# Altium PCB OpenRex_V1I1_PCB.PcbDoc (part 3 of 12)
Units mm, origin at the board's own origin, x right, y up, seen from the top; angles counter-clockwise.
Board outline 70 x 95 mm, 10 copper layers (L1, L2, L3, L4 (PWR), L5 (PWR), L6 (PWR), L7 (PWR), L8, L9, L10), stack 1.632 mm thick; 1080 components, 708 nets, 3831 pads, 2373 vias.
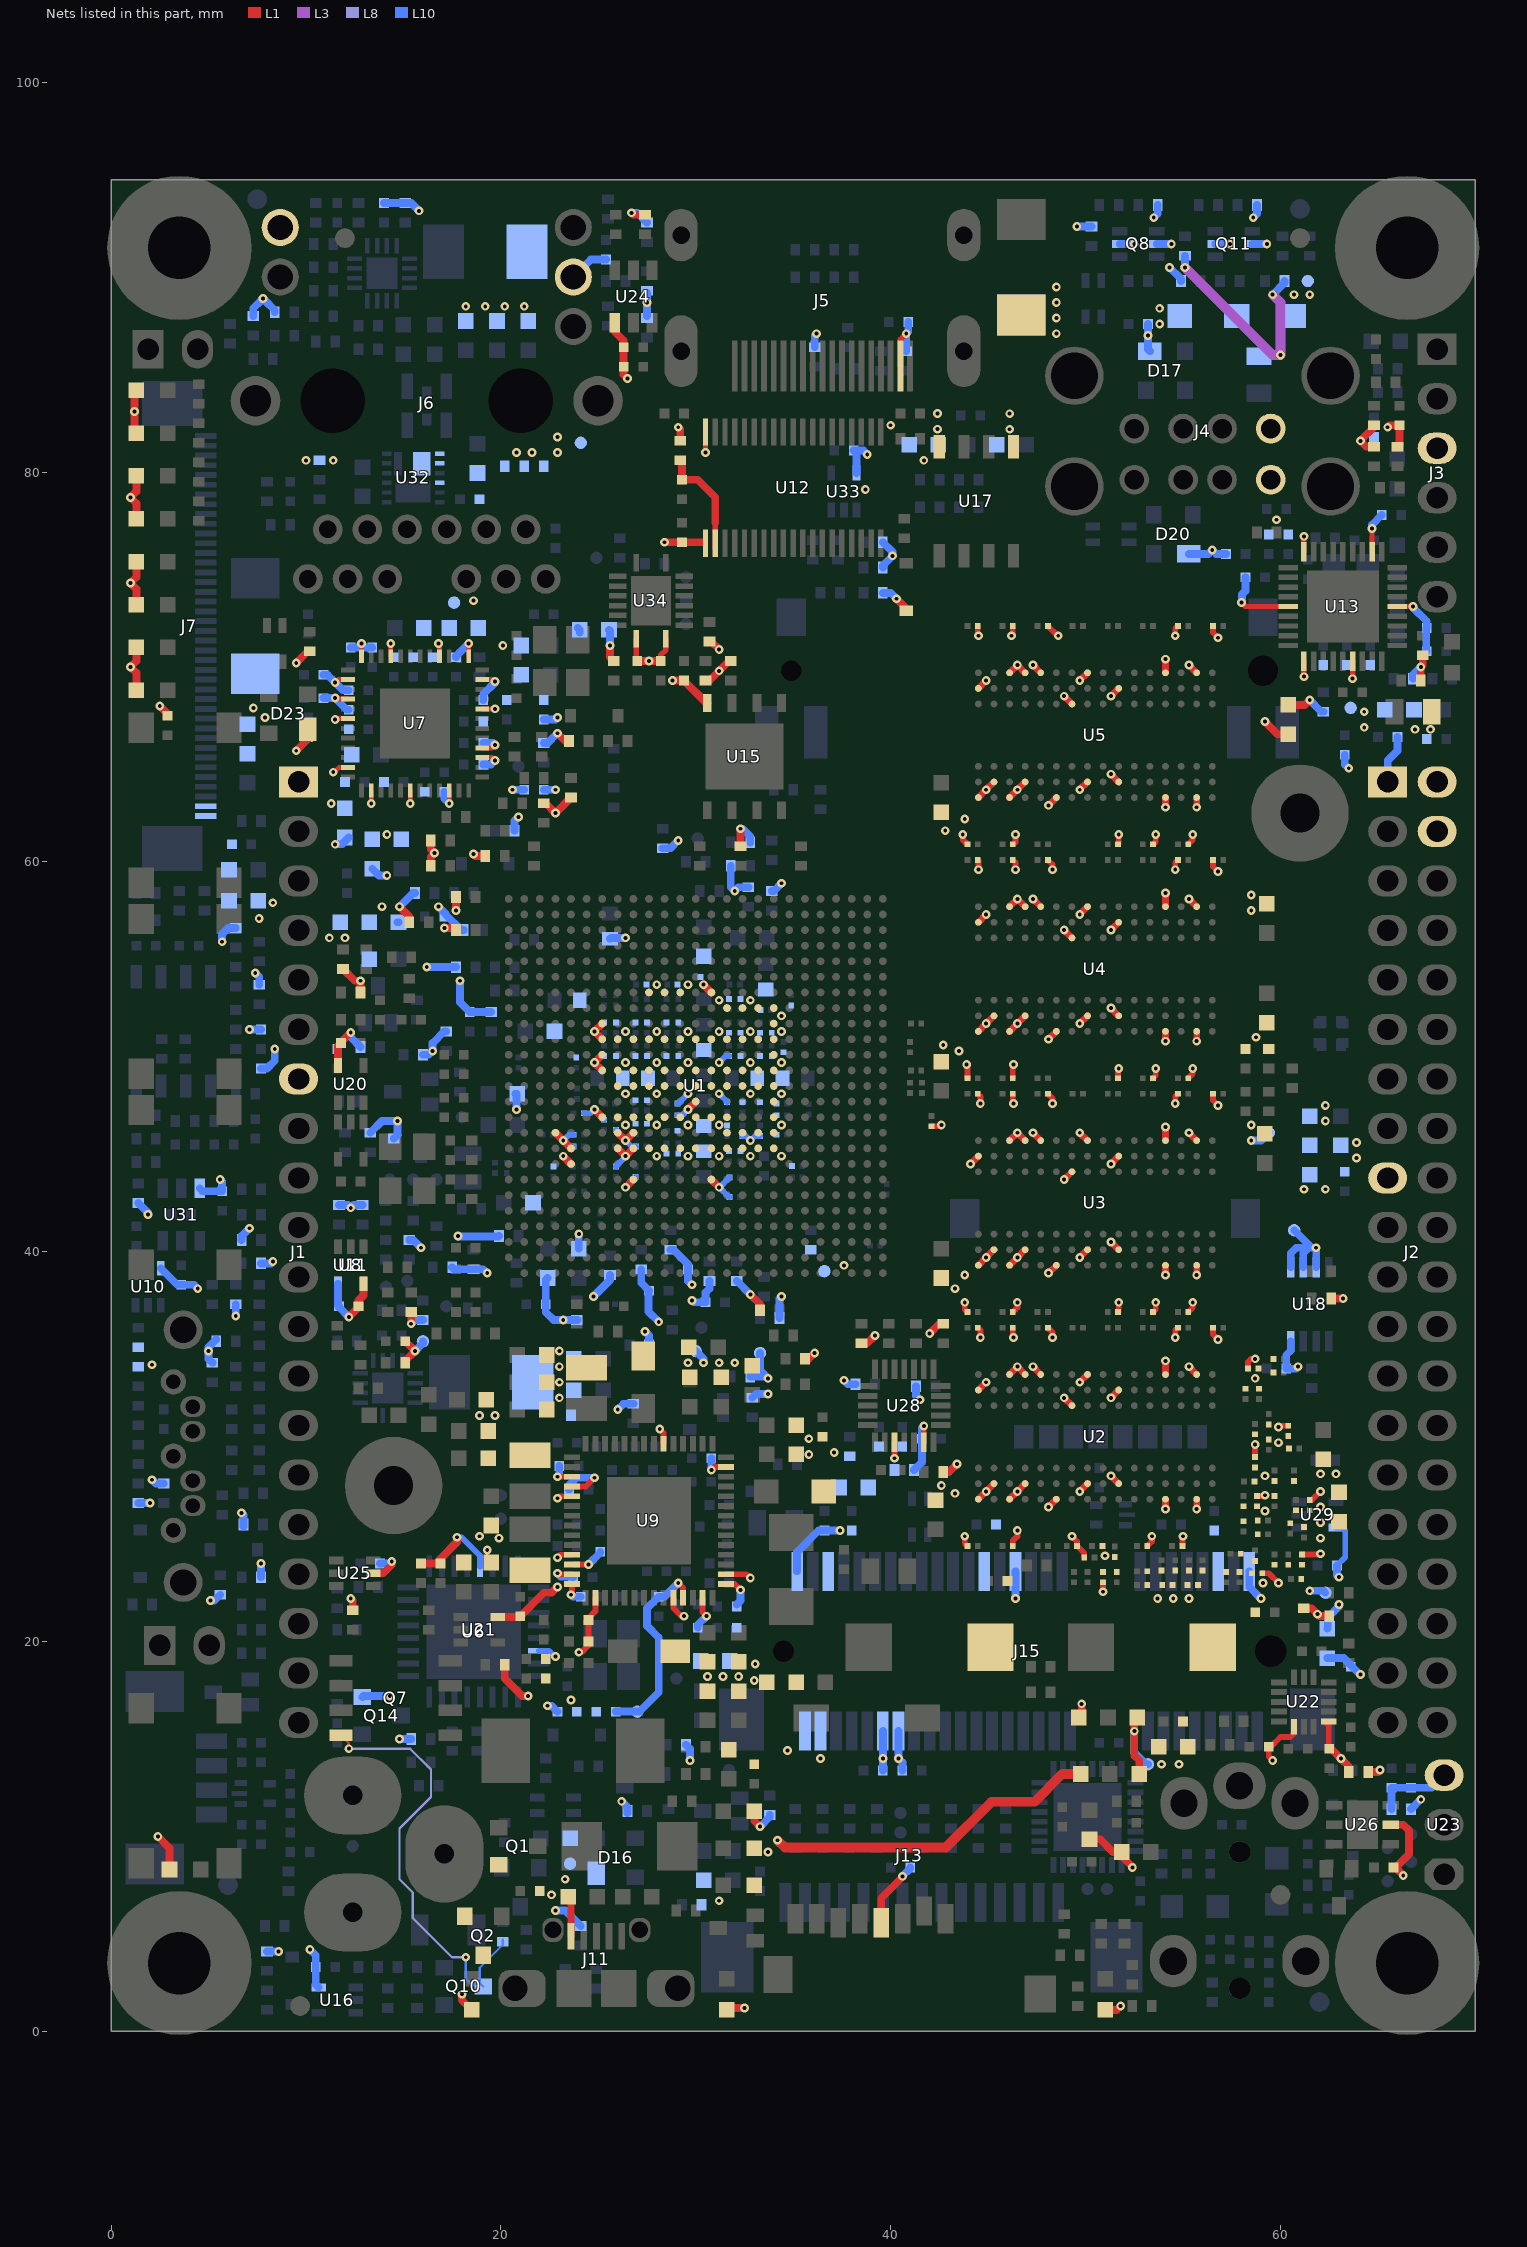
[diagram p11: the nets of this part, all layers, seen from the top]

## Footprints (in the part's own frame and the unit in brackets; to place one, negate y for a bottom-side part, rotate by r counter-clockwise, add the part's x,y. Pads: shape width x height; smd on the part's side, far side on the other; paste and mask are expansions set on the pad) (continued)
SC70_5 [mm]
  rect 0.75x0.4 smd mask+0.025: 1(-0.95,0.65) 2(-0.95,0) 3(-0.95,-0.65) 4(0.95,-0.65) 5(0.95,0.65)
  silkscreen extent -0.76,-1.14 0.76,1.14, body extent -1.21,-1.14 1.21,1.14, height 1.1
SC70_6 [mm]
  rect 0.75x0.4 smd mask+0.025: 1(-0.95,0.65) 2(-0.95,0) 3(-0.95,-0.65) 4(0.95,-0.65) 5(0.95,0) 6(0.95,0.65)
  silkscreen extent -0.76,-1.14 0.76,1.14, body extent -1.21,-1.14 1.22,1.14, height 1.1
SC70_SOT323 [mm]
  rect 0.9x0.7 smd: 1(-0.95,0.65) 2(-0.95,-0.65) 3(0.95,0)
  silkscreen extent -0.7,-1.27 0.7,1.27, body extent -1.27,-1.27 1.27,1.27, height 1.1
SIM_MICRO_HINGED [mm] "Creator MM"
  rect 1x1.2 smd mask+0.06: C1(-4.72,-5.6) C2(-2.18,-5.6) C3(0.36,-5.6) C4(2.9,-5.6) C5(-3.45,-5.6) C6(-0.91,-5.6) C7(1.63,-5.6) C8(4.17,-5.6)
  rect 1.5x2 smd: G1(-7.2,5.6) G2(7.2,5.6)
  silkscreen extent -7.5,-5.9 7.5,10.6, body extent -7.7,-5.8 7.7,10.5, height 1.87
SMC [mm]
  rect 2.5x3.3 smd: 1(-3.45,0) 2(3.45,0)
  silkscreen extent -4.6,-3.2 4.65,3.2, body extent -3.98,-2.95 3.97,2.95, height 2.3
SOD323 [mil]
  rect 22x27 smd mask+3: 1(-48,0) 2(48,0)
  silkscreen extent -75,-28 71,28, body extent -49,-25 49,25, height 39
SOD-123FL [mm] "Wider inside part of pads. Creator MM"
  rect 1.25x1.22 smd: 1(-1.475,0) 2(1.475,0)
  silkscreen extent -2.5,-0.9 2.4,0.9, body extent -1.8,-0.82 1.8,0.83, height 0.95
SOT23-6_DBV6 [mm]
  rect 1x0.55 smd: 1(-1.35,0.95) 2(-1.35,0) 3(-1.35,-0.95) 4(1.35,-0.95) 5(1.35,0) 6(1.35,0.95)
  silkscreen extent -1.6,-1.53 0.9,1.7, body extent -1.5,-1.5 1.5,1.5, height 1.45
SOT143 [mm]
  rect 0.9x1.2 smd: 1(-1,0.8)
  rect 0.9x0.8 smd: 2(-1,-1) 3(1,-1) 4(1,1)
  silkscreen extent -1,-1.7 1,1.7, body extent -1,-1.7 1,1.7, height 1
SOT363 [mm] "Creator MM Used Diodes land pattern as suggested"
  rect 0.8x0.42 smd mask+0.06: 1(-0.95,0.65) 2(-0.95,0) 3(-0.95,-0.65) 4(0.95,-0.65) 5(0.95,0) 6(0.95,0.65)
  silkscreen extent -1.4,-1.2 0.7,1.4, body extent -1.2,-1.1 1.2,1.1, height 1.1
SOT665 [mm] "Creator MM"
  rect 0.65x0.325 smd mask+0.05: 1(-0.75,0.538) 3(-0.75,-0.538)
  rect 0.8x0.25 smd mask+0.05: 2(-0.825,0)
  rect 0.65x0.4 smd mask+0.05: 4(0.75,-0.5) 5(0.75,0.5)
  silkscreen extent -1.2,-0.92 0.8,1.2, body extent -0.8,-0.8 0.8,0.8, height 0.6
SOT-23-3-123 [mm]
  rect 0.9x0.8 smd: 1(-1,0.95) 2(-1,-0.95) 3(1,0)
  silkscreen extent -0.76,-1.65 0.76,1.65, body extent -1.27,-1.65 1.27,1.65, height 1.1
TACT_SMD [mm]
  rect 1.55x1.3 smd mask+0.06: 1(-3.975,2.25) 2(3.975,2.25) 3(-3.975,-2.25) 4(3.975,-2.25)
  silkscreen extent -3.1,-3.1 3.1,3.1, body extent -4.5,-3 4.5,3, height 5
TP_25C [mm]
  round 0.635 smd paste-0.635 mask+0.051: 1(0,0)
TSOP382 [mm] "Creator MM"
  oct 2x1.6 hole 1.1 mask+0.03: 1(0,0)
  oval 2x1.6 hole 1.1 mask+0.03: 2(0,-2.54) 3(0,-5.08)
  silkscreen extent -3.75,-5.2 1.6,0.1, body extent -3.57,-5.33 1.6,0.25, height 10
TSSOP_38 [mm]
  rect 1.4x0.28 smd mask+0.025: 1(-2.85,4.5) 2(-2.85,4) 3(-2.85,3.5) 4(-2.85,3) 5(-2.85,2.5) 6(-2.85,2) 7(-2.85,1.5) 8(-2.85,1) 9(-2.85,0.5) 10(-2.85,0) 11(-2.85,-0.5) 12(-2.85,-1) 13(-2.85,-1.5) 14(-2.85,-2) 15(-2.85,-2.5) 16(-2.85,-3) 17(-2.85,-3.5) 18(-2.85,-4) 19(-2.85,-4.5) 20(2.85,-4.5) 21(2.85,-4) 22(2.85,-3.5) 23(2.85,-3) 24(2.85,-2.5) 25(2.85,-2) 26(2.85,-1.5) 27(2.85,-1) 28(2.85,-0.5) 29(2.85,0) 30(2.85,0.5) 31(2.85,1) 32(2.85,1.5) 33(2.85,2) 34(2.85,2.5) 35(2.85,3) 36(2.85,3.5) 37(2.85,4) 38(2.85,4.5)
  silkscreen extent -3.1,-5 2.3,5.1, body extent -2.3,-5 2.3,5, height 1.2
USB-2A [mm] "Creator MM"
  round 1.524 hole 1: 1(3.5,0.13) 2(1,0.13) 3(-1,0.13) 4(-3.5,0.13) 5(3.5,-2.49) 6(1,-2.49) 7(-1,-2.49) 8(-3.5,-2.49)
  round 3 hole 2.4: 9(-6.57,2.84) 10(6.57,2.84) 11(-6.57,-2.84) 12(6.57,-2.84)
  silkscreen extent -10.75,-4.5 10.75,18.4, body extent -8.1,-4.1 8.14,13.08, height 15.78
USB_MICRO_AB [mm] "Creator MM"
  rect 1.35x0.35 smd mask+0.025: 1(2.675,1.3) 2(2.675,0.65) 3(2.675,0) 4(2.675,-0.65) 5(2.675,-1.3)
  rrect84% 1.25x1.1 hole 0.85 mask+0.04: 6(3,2.225) 7(3,-2.225)
  rrect60% 1.9x2.425 hole 1.3 copper offset 0,-0.363: 8(0,4.175)
  rect 1.9x1.8 smd paste-10: 9(0,1.15) 10(0,-1.15)
  rrect60% 1.9x2.425 hole 1.3 copper offset 0,0.363: 11(0,-4.175)
  silkscreen extent -4.75,-5.4 2.85,5.4, body extent -2.75,-4.32 3.04,4.33, height 2.76
WSON8_6X5MM [mm] "Creator MM"
  rect 0.9x0.45 smd: 1(-2.75,1.905) 2(-2.75,0.635) 3(-2.75,-0.635) 4(-2.75,-1.905) 5(2.75,-1.905) 6(2.75,-0.635) 7(2.75,0.635) 8(2.75,1.905)
  rect 3.4x4 smd: 9(0,0)
  silkscreen extent -3.1,-2.6 3.1,3.1, body extent -3,-2.5 3,2.5, height 0.8
ZIF_RA_BOTTOM_15X1MM [mm] ".Creator MM Added overlay if not moutef properly"
  rect 0.61x2 smd: 1(-7,1.4) 2(-6,1.4) 3(-5,1.4) 4(-4,1.4) 5(-3,1.4) 6(-2,1.4) 7(-1,1.4) 8(0,1.4) 9(1,1.4) 10(2,1.4) 11(3,1.4) 12(4,1.4) 13(5,1.4) 14(6,1.4) 15(7,1.4)
  rect 2.68x3.6 smd: 16(-9.99,-1.4) 17(9.99,-1.4)
  silkscreen extent -11.6,-7 11.6,1.5, body extent -11.46,-5.04 11.46,1.5, height 2.53

## Part data
C1 C2 C3 C4 C5 C6 C8 C9 C10 C11 C12 C21 C22 C23 C24 C25 C26 C30 C34 C35 C36 C37 C38 C39 C40 C41 C42 C43 C44 C45 C46 C47 C48 C49 C50 C51 C52 C53 C54 C55 C56 C57 C58 C59 C60 C61 C62 C64 C68 C73 C75 C76 C77 C79 C81 C82 C90 C91 C92 C93 C94 C95 C97 C98 C99 C100 C102 C103 C104 C105 C107 C108 C109 C110 C112 C113 C114 C115 C116 C117 C119 C120 C121 C122 C123 C124 C125 C126 C130 C131 C132 C133 C134 C136 C138 C140 C142 C143 C144 C145 C146 C149 C150 C152 C154 C155 C157 C158 C159 C160 C161 C162 C163 C164 C165 C166 C167 C168 C169 C170 C171 C174 C203 C204 C205: library part C0603X5R0J224M030BB, "CAP CER 0.22UF 6.3V 20% X5R 0201"
C7 C13 C14 C15 C16 C17 C18 C74 C85 C86 C206 C229 C277 C297 C305 C306 C308 C317 C318 C319 C320 C322 C323: library part C0603X5R1C104K030BC, "CAP CER 0.1UF 16V 10% X5R 0201"
C19 C80 C180 C186 C191 C194 C199 C225 C227 C231 C239 C240 C278 C280 C299 C419: library part C1608X5R0J106M, "CAP CER 10UF 6.3V X5R 20% 0603"
C20 C27 C28 C29 C31 C32 C33 C321 C352 C353 C354 C355 C356 C357 C358 C359 C360 C361 C362 C363 C408 C409 C424 C425 C429 C430 C431: library part GRM188R60G226MEA0L, "CAP CER 22UF 4V 20% X5R 0603"
C63 C65 C66 C67 C87 C89 C181 C187 C190 C192 C195 C207 C213 C214 C215 C216 C217 C218 C219 C221 C226 C228 C230 C232 C235 C236 C243 C250 C252 C255 C256 C259 C260 C261 C265 C266 C267 C268 C269 C270 C272 C273 C274 C275 C276 C279 C281 C282 C283 C284 C285 C292 C294 C296 C298 C300 C301 C302 C303 C307 C309 C310 C314 C315 C316 C324 C325 C329 C340 C341 C342 C345 C346 C349 C350 C368 C370 C371 C374 C380 C382 C383 C384 C385 C386 C388 C389 C392 C393 C395 C398 C399 C401 C402 C403 C405 C412 C413 C414 C416 C417 C418 C420 C422 C423 C435: library part C1005X5R1H104K, "CAP CER .10UF 50V X5R 10% 0402"
C69 C70 C71 C72 C182 C183 C184 C185 C188 C189 C193 C196 C197 C198 C200 C201 C202 C220 C222 C248 C249 C313 C396 C404: library part C1005X7R1H103K, "CAP CER 10000PF 50V 10% X7R 0402"
C78 C208 C209 C244 C245 C246 C247 C251 C262 C263 C264 C333 C336 C344 C347 C348 C351 C369 C372 C373 C387 C391 C397: library part C1005X5R1A475M, "CAP CER 4.7UF 10V 20% X5R 0402"
C83 C84 C223 C224 C242 C415: library part C1005C0G1H180J, "CAP CER 18PF 50V C0G 5% 0402"
C88 C233 C234 C238: library part TPSC107K010R0150, "CAP TANT 100UF 10V 10% 2312"
C96 C101 C106 C111 C118 C127 C128 C129 C135 C172 C173: library part GRM188R60G226MEA0L_small, "CAP CER 22UF 4V 20% X5R 0603"
C137 C141 C147 C148 C151 C156 C364 C365 C381 C406 C407 C426 C427 C428: library part C1608X5R0J226M080AC, "CAP CER 22UF 6.3V 20% X5R 0603"
C139: library part C0603X5R1C103K030BA, "CAP CER .01UF 16V 10% X5R 0201"
C153 C378 C390: library part C1005X5R1E224M, "CAP CER .22UF 25V X5R 20% 0402"
C175 C176 C177 C178 C179 C210 C410 C432: library part C1005C0G1H220J, "CAP CER 22PF 50V C0G 5% 0402"
C211 C212: library part C0603C0G1H180J030BA, "CAP CER 18PF 50V 5% C0G 0201"
C237 C253 C254 C271 C293 C326 C330 C332 C335 C339 C375 C377 C379 C394 C400 C437: library part C1005X5R1C105K, "CAP CER 1.0UF 16V X5R 0402"
C241: library part GRM1555C1H561JA01D, "CAP CER 560PF 50V C0G 0402"
C257 C258: library part T520D337M006ATE045, "CAP TANT 330UF 6.3V 20% 2917"
C286 C287 C295: library part GRM155R71H271KA01D, "CAP CER 270PF 50V 10% X7R 0402"
C288 C289 C311 C312: library part C1005C0G1H101J, "CAP CER 100PF 50V 5% NP0 0402"
C290 C291: library part TLNS227M004R3000, "CAP TANT 220UF 4V 20% 1206"
C304 C367 C376 C421: library part C2012X5R1C106M, "CAP CER 10UF 16V 20% X5R 0805"
C327 C328: library part C0603C0G1H2R2C030BA, "CAP CER 2.2PF 50V C0G 0201"
C331 C334 C337 C338 C436: library part C1005X5R1A225K, "CAP CER 2.2UF 10V 10% X5R 0402"
C343: library part C1005X5R1C474K, "CAP CER .47UF 16V X5R 0402"
C366 C434: library part C1608X5R1A226M080AC, "CAP CER 22UF 10V X5R 0603"
C411 C433: library part C1005X7R1H221K, "CAP CER 220PF 50V X7R 10% 0402"
CR1: library part Card_Mini_PCIe, "Card MIni PCIe"
CR2: library part Card_Micro_SD, "Card Micro SD"
CR3: library part Card_Micro_SIM, "Card Micro SIM"
D1 D2 D3 D5 D6 D7 D33 D34: library part "LS L29K-H1J2-1-Z", "LED SMARTLED RED 630NM 0603 SMD"
D4 D8 D19 D31 D32: "SUPPRESSOR ESD 24VDC 0603 SMD"
D9: "DIODE GEN PURP 1KV 8A SMC"
D10 D27 D28 D29 D35 D36 D39: "DIODE SCHTKY 30MA 30V SOD-323"
D11 D22 D25 D26: library part "LG L29K-G2J1-24-Z", "LED SMARTLED GREEN 570NM 0603"
D12 D14 D21 D24: library part "LO L29K-H2K1-24-Z", "LED SMARTLED ORANGE 606NM 0603"
D13: "DIODE SCHOTTKY 30V 0.2A SOD323"
D15 D37: "TVS ZENER QUAD 5.6V SOT665"
D16 D17 D20 D23: "DIODE SWITCHING 50V SOT-143"
D18 D30 D38: "DIODE SCHOTTKY 40V 1A SOD123L"
FB1 FB2 FB9 FB10 FB14 FB16 FB17 FB31 FB32 FB34 FB35 FB37 FB39 FB40 FB41 FB42: library part BLM18SG221TN1D, "FERRITE CHIP 220 OHM 2500MA 0603"
FB3 FB4 FB6 FB7: "FERRITE CHIP 100 OHM BEAD 0603 3A"
FB5 FB18 FB21 FB22 FB29 FB30 FB43 FB44: "FERRITE CHIP 600 OHM 0402 420mA"
FB8: library part BLM15AX300SN1D, "FERRITE CHIP 30 OHM 1100MA 0402"
FB11 FB12 FB13 FB19 FB20 FB23 FB24 FB26 FB33 FB36 FB38: library part MPZ1608S601A, "FERRITE CHIP BEAD 600 OHM SMD 1A"
FB15 FB25 FB27 FB28: library part BLM15PD121SN1D, "FERRITE CHIP 120 OHM 1300MA 0402"
FID1 FID2 FID3 FID4 FID5 FID6 FID7 FID8: "Fiducial 40mil Diameter, 52mil Mask"
J1: "CONN RCPT 20POS .100\" DUAL GOLD"
J2: "CONN RCPT 40POS .100\" DUAL GOLD"
J3: library part 68001-206HLF, "CONN HEADER 6POS .100 STR 15AU"
J4: library part 5787617-1_v1.1, "CONN RCPT R/A 4OVER4POS GOLD PCB"
J5: library part 47151-0001_v1.1, "CONN RCPT 19POS HDMI RT ANG SMD"
J6: "CONN MAGJACK 1PORT SHLD 1000BT"
J7: "CONN FPC BOTTOM 40POS 0.50MM R/A"
J8: "CONN SATA HDR 7POS PCB VERT"
J9: library part PJ-002AH_v1.1, "CONN PWR JACK 2.1X5.5MM HIGH CUR"
J10: "CONN HEADER 4POS 1.25MM R/A SMD"
J11: library part 0475890001, "CONN RCPT MICRO USB AB R/A SMD"
J12: "CONN FPC BOTTOM 15POS 1.00MM R/A"
J13: "CONN MICRO SD 8 POS SMD"
J14: "CLIFF ELECTRONIC COMPONENTS - FC68125 - CONNECTOR, PHONO, 3.5MM, JACK, 4POLE"
J15: "CONN MINI EXPRESS CARD 52POS SMD"
J16: "CONN MINI EXPRESS CARD LATCH SMD"
J17: "CONN SMART CARD"
JP1 JP2: library part 68001-202HLF, "BERGSTIK II .100\" SR STRAIGHT"
L1 L2: library part IHLP1212AEER1R0M11, "FIXED IND 1UH 3.9A 33 MOHM SMD"
L3 L4 L5 L6 L7: "CHOKE COMM MODE 90 OHM .4A SMD"
L8 L9 L10: library part IFSC1008ABER1R0M01, "FIXED IND 1UH 2.6A 43 MOHM SMD"
L11: library part IHLP1616ABER2R2M11, "FIXED IND 2.2UH 2.75A 83.5 MOHM"
L12 L13: library part IHLP2020BZER1R0M11, "INDUCTOR POWER 1.0UH 7.5A SMD"
MH1 MH2 MH3 MH4: "Mounting Hole 7.4mm Diameter, 3.2mm Drill"
MH5 MH6: "Mounting Hole 5mm Diameter, 2mm Drill"
Q1 Q2: "MOSFET P-CH 20V 3.6A SOT-23"
Q3 Q4 Q5 Q6 Q9 Q12 Q13: "MOSFET N-CH 60V 310MA SOT323"
Q7: "MOSFET P-CH 30V 8.8A 8-SOIC"
Q8 Q11: "MOSFET 2N-CH 60V 0.3A 6TSSOP"
Q10 Q14: "TRANS PNP 40V 0.2A SOT23"
R1 R2 R3 R11 R12 R22 R31 R34 R38 R39 R40 R42 R44 R45 R50 R66 R72 R77 R79 R103 R105 R106 R107 R108 R111: library part MCR006YRTF47R0, "RES SMD 47 OHM 1% 1/20W 0201"
R4 R5 R8 R9 R10 R306 R307 R308 R309: library part RMCF0201FT240R, "RES 240 OHM 1/20W 1% 0201"
R6 R7: library part RC0201FR-0710KL, "RES 10K OHM 1/20W 1% 0201 SMD"
R13 R14 R18 R19 R24 R25 R26 R27 R29 R33 R36 R41 R46 R51 R60 R65 R67 R70 R71 R74 R76 R78 R80 R88 R93 R104 R117 R119 R120 R121 R122 R123 R125 R126 R127 R128 R129 R135 R136 R138 R139 R154 R155 R156 R158 R169 R170 R177 R178 R179 R180 R182 R183 R184 R194 R195 R196 R204 R207 R218 R227 R228 R234 R236 R238 R241 R242 R243 R247 R248 R258 R259 R271 R273 R276 R277 R278 R279 R281 R282 R287 R288 R297 R298 R304 R311 R313 R314 R316 R318 R320 R321 R322 R323 R324 R325 R326 R327 R328 R329 R330 R331 R332 R333 R334 R340 R341 R342 R343 R345 R348 R350 R351 R352 R353 R354 R355 R357 R361 R362 R363 R364 R366 R367 R368 R369 R373 R374 R378 R384 R389 R390 R391 R392 R397 R404 R406 R407 R411 R412 R413: library part RC0402JR-070RL, "RES 0.0 OHM 1/16W 0402 SMD"
R15 R48 R49 R52 R53 R54 R57 R58 R59 R62 R63 R64 R68 R69 R75 R91 R94 R95 R96 R97 R98 R109 R110 R114 R115 R116 R140 R143 R144 R147 R150 R151 R159 R163 R164 R166 R173 R174 R175 R191 R197 R198 R199 R201 R208 R209 R210 R211 R212 R213 R225 R229 R240 R244 R250 R251 R252 R265 R270 R272 R280 R283 R284 R285 R286 R289 R293 R303 R305 R310 R312 R315 R317 R319 R335 R359 R360 R380 R381 R382 R383 R398 R405 R410: library part RC0402FR-0710KL, "RES 10.0K OHM 1/16W 1% 0402 SMD"
R16 R17: library part RC0402FR-0749R9L, "RES 49.9 OHM 1/16W 1% 0402 SMD"
R20: library part CRCW04022M20FKED, "RES 2.20M OHM 1/16W 1% 0402 SMD"
R21 R118 R237 R263 R264 R356 R403: library part RC0402FR-0747KL, "RES 47.0K OHM 1/16W 1% 0402 SMD"
R23: library part ERJ-2RKF1601X, "RES 1.6K OHM 1/10W 1% 0402 SMD"
R28 R87 R89 R132 R133 R134 R137 R142 R148 R157 R171 R172 R187 R188 R205 R257 R290 R291 R302: library part RMCF0402FT4K99, "RES TF 4.99K OHM 1% 1/16W 0402"
R30 R101 R102 R162 R219 R346: library part RC0402FR-071KL, "RES 1.00K OHM 1/16W 1% 0402 SMD"
R32: library part CRCW02011K60FKED, "RES 1.60K OHM 1/20W 1% 0201 SMD"
R35 R43 R83 R85 R86 R90 R92 R124 R130 R131 R152 R153 R161 R181 R206 R275: library part RC0402FR-0722RL, "RES 22.0 OHM 1/16W 1% 0402 SMD"
R37: library part CRCW0402200RFKED, "RES 200 OHM 1/16W 1% 0402 SMD"
R47 R230 R231: library part RC0402FR-0715KL, "RES 15.0K OHM 1/16W 1% 0402 SMD"
R55 R56: library part RMCF0201FT4K99, "RES 4.99K OHM 1/20W 1% 0201"
R61: library part RC0201FR-071KL, "RES 1K OHM 1/20W 1% 0201 SMD"
R73 R203 R214 R215 R216 R217 R220 R221 R223 R224 R239 R261 R262 R266 R338 R344 R347 R365 R385 R393 R394 R395 R396 R401 R408: library part RMCF0402FT100K, "RES 100K OHM 1/16W 1% 0402 SMD"
R81 R82: library part RC0402FR-07220RL, "RES 220 OHM 1/16W 1% 0402 SMD"
R84: library part RC0402FR-0712K1L, "RES SMD 12.1K OHM 1% 1/16W 0402"
R99: library part ERJ-1GEF1910C, "RES 191 OHM 1/20W 1% 0201 SMD"
R100: library part RNCP1206FTD1K00, "RES SMD 1K OHM 1% 1/2W 1206"
R112 R113 R253 R256: library part MCR006YRTF49R9, "RES 49.9 OHM 1/20W 1% 0201 SMD"
R141 R149 R232 R233 R254 R255 R299 R300: library part RMCF0402FT33R0, "RES TF 33 OHM 1% 1/16W 0402"
R145 R165 R176 R189 R192 R193 R200 R202 R387: library part RC0402FR-071K5L, "RES 1.50K OHM 1/16W 1% 0402 SMD"
R146 R185 R186 R226 R245 R274 R379: library part RMCF0402FT240R, "RES TF 240 OHM 1% 0.0625W 0402"
R160: library part ERJ-1GEF6041C, "RES 6.04K OHM 1/20W 1% 0201 SMD"
R167: library part CRCW040210M0FKED, "RES 10.0M OHM 1/16W 1% 0402 SMD"
R168: library part MCR006YZPF1005, "RES 10M OHM 1/20W 1% 0201 SMD"
R190: library part RC0402FR-0727KL, "RES 27.0K OHM 1/16W 1% 0402 SMD"
R222: library part RC0402FR-0712KL, "RES 12.0K OHM 1/16W 1% 0402 SMD"
R235: library part RC0402FR-072K2L, "RES 2.20K OHM 1/16W 1% 0402 SMD"
R246 R249: library part RC0402FR-0760R4L, "RES SMD 60.4 OHM 1% 1/16W 0402"
R260: library part RC0201FR-07100KL, "RES 100K OHM 1/20W 1% 0201 SMD"
R267 R268 R269: library part CRCW0402330RFKED, "RES 330 OHM 1/16W 1% 0402 SMD"
R292: library part CRCW040211K8FKED, "RES 11.8K OHM 1/16W 1% 0402 SMD"
R294 R295: library part RC0805JR-070RL_small, "RES 0.0 OHM 1/8W 0805 SMD"
R296: library part CRCW040210K5FKED, "RES 10.5K OHM 1/16W 1% 0402 SMD"
R301: library part CRCW0402470KFKED, "RES 470K OHM 1/16W 1% 0402 SMD"
R336: library part RC0402FR-0782KL, "RES 82.0K OHM 1/16W 1% 0402 SMD"
R337 R400: library part RC0402FR-07150KL, "RES 150K OHM 1/16W 1% 0402 SMD"
R339: library part CRCW040263K4FKED, "RES SMD 63.4K OHM 1% 1/16W 0402"
R358: library part RC0402FR-071ML, "RES 1.00M OHM 1/16W 1% 0402 SMD"
R370 R371 R372 R375 R376 R377: library part RC0402FR-073K3L, "RES 3.30K OHM 1/16W 1% 0402 SMD"
R386: library part RC0402FR-0724KL, "RES SMD 24K OHM 1% 1/16W 0402"
R388: library part RC0402FR-073KL, "RES 3K OHM 1/16W 1% 0402 SMD"
R399: library part CRCW0402390KFKED, "RES 390K OHM 1/16W 1% 0402 SMD"
R402: library part RC0402FR-0786K6L, "RES SMD 86.6K OHM 1% 1/16W 0402"
SW1 SW2 SW3 SW4: "SWITCH TACTILE SPST-NO 0.05A 12V"
TP1 TP2 TP3 TP4 TP5 TP6 TP7 TP8 TP9 TP10 TP11 TP12 TP13 TP14 TP15 TP16 TP17 TP18 TP19 TP20 TP21 TP22 TP23 TP24 TP25 TP26 TP27 TP28 TP29 TP30 TP31 TP32 TP33 TP34 TP35 TP36 TP37 TP38 TP39 TP40 TP41: "Test Point 25mil"
U1: "IC MCU 32BIT ARM QUAD 624FCBGA"
U2 U3 U4 U5: "IC DDR3 SDRAM 4GBIT 800MHZ FBGA"
U6: library part LPC1345FHN33,551, "IC MCU ARM 32KB FLASH 32HVQFN"
U7: "IC TXRX ETHERNET 48-QFN"
U8 U10 U21: "IC GATE AND 1CH 2-INP SC-70-5"
U9: "IC PWR MGMT I.MX6 56QFN"
U11 U20 U35: "SINGLE POSITIVE AND GATE SC-70"
U12: "IC HDMI TX PORT P/I 38-TSSOP"
U13: "USB HUB CONT IND TEMP 36QFNE3"
U14: "IC AUDIO CODEC STEREO 32-QFN"
U15: "IC FLASH 32MBIT"
U16: "IC BUFF CMOS LVL/SFTR N-I SOT353"
U17: "IC SW DISTRIBUTION 2CHAN 8SOIC"
U18: "IC EEPROM 2KBIT 400KHZ 8MSOP"
U19: library part TJA1040T/CM,118, "IC TRANSCEIVER CAN 8SOIC"
U22: "SENSOR XTRINSIC 6-AXIS QFN"
U23: "IC IR RCVR MOD 38KHZ DOME AXIAL"
U24: "IC DIGITAL TEMP SENSOR SOT23-6"
U25: "IC SWITCH SPDT SC70-6"
U26: "SENSIRION - SHT21 - SENSOR, HUMIDITY & TEMP, 3X3MM, 2%"
U27: "IC VREF SHUNT ADJ SOT23-3"
U28: "GYROSCOPE 3-AXIS 24QFN"
U29: "IC SGL SCHMT-TRIG INVERT SC70-5"
U30 U36: "IC REG BUCK SYNC ADJ 4A 16TQFN"
U31: library part TPS3808G09DBVR, "IC VOLT SUPERVISOR 0.9V SOT23-6"
U32: "IC PWM REG 600mA 1.2V 12-MLF"
U33: "IC BUFFER SCHMIT TRIG SC705"
U34: "IC BUS TRANSCVR 4BIT 16QFN"
Y1 Y4: library part ABM8-24.000MHZ-R60-D-1-W-T, "CRYSTAL 24MHZ 18PF SMD"
Y2: library part ABS06-32.768KHZ-9-1-T, "CRYSTAL 32.768 KHZ 9.0 PF SMD"
Y3: library part ABM8G-25.000MHZ-18-D2Y-T, "CRYSTAL 25MHZ 18PF SMD"
Y5: "CRYSTAL 12MHZ 12PF SMD"

## Via types
v1: diameter 0.45, hole 0.2, L1 to L10, tented both sides, 2369 vias
v2: diameter 1, hole 0.5, L1 to L10, tented top, 4 vias

## Nets (pads, with @x,y where several pads share a name; then routed paths per layer and width w, separated by ;. In a path a pad name is that pad's centre, name@x,y a point inside that pad or via, vN(x,y) a via of type N, cw(c..) or ccw(c..) an arc to the next point about the centre after c; other vN are vias at no path point)
5V_IN_CTRL: Q7.4 Q10.3 R301.2 | length 22.6
  L1 w0.114: Q7.4@11.8,15.195 12.2,14.795 v1(12.2,14.5)
  L8 w0.12: v1(12.2,14.5) 15.344,14.5 16.415,13.429 16.415,12.015 14.8,10.4 14.8,7.796 15.48,7.116 15.48,5.82 17.5,3.8 v1(18.2,3.8)
  L10 w0.114: v1(18.2,3.8) 18.2,2.7 18.5,2.4 Q10.3@19,2.4 ; Q10.3@19.1,2.3 Q10.3@19,2.4 ; R301.2@20.1,4.7 20.1,4.444 18.915,3.259 18.915,2.485 Q10.3@19,2.4
+0V75_DDR_VTT: C13.2 C14.2 C15.2 C16.2 C17.2 C18.2 C20.2 C74.2 C85.2 C86.2 C206.2 C229.1 C277.1 C297.1 C305.1 C306.1 C308.1 C317.1 C318.1 C319.1 C320.1 C321.1 C362.1 C363.1 C425.1 L9.2 R1.2 R2.2 R3.2 R11.2 R12.2 R22.2 R31.2 R34.2 R38.2 R39.2 R40.2 R42.2 R44.2 R45.2 R50.2 R66.2 R72.2 R77.2 R79.2 R103.2 R105.2 R106.2 R107.2 R108.2 R111.2 TP14.1 U9.19 | length 1.6
  L1 w0.3: v1(22.9,27.35) 23,27.45 U9.19@23.65,27.45
  L10 w0.4: v1(61.5,22.6) 62.2,22.6 TP14.1@62.3,22.5
  other v1: 53.7,22.2 55.3,22.2 59.1,23 51,24.4 59.2,26.7 62.05,26.9 59.2,28.5 62.05,28.6 62.85,28.6 59.9,30.2 18.9,31.6 19.7,31.6 58.7,33.5
+1V1_NVCC_PLL_OUT: C150.1 C151.1 U1.E8 | length 0.6
  L1 w0.4: v1(23.2,44.9) U1.E8@23.6,44.5
  L10 w0.3: v1@23.2,44.865 v1(23.2,44.9)
+1V1_VDDSOC_CAP: C78.1 C112.1 C113.1 C114.1 C115.1 C116.1 C117.1 C118.1 C138.1 C246.1 FB1.1 R13.1 R18.1 R27.1 U1.N12 U1.R10 U1.T10 U1.T13 U1.T14 U1.U10 U1.U13 U1.U14 | length 9.7
  L1 w0.4: v1(29.6,47.3) U1.N12@30,47.7
  L10 w0.3: C138.1@29.065,47 29.3,47 v1(29.6,47.3) ; C112.1@32.4,45.935 32.565,45.935 v1(32.8,45.7) 33.035,45.935 C113.1@33.3,45.935
  L10 w0.4: FB1.1@22.4,38.65 22.3,38.55 C78.1@22.3,37.3 22.3,36.9 22.7,36.5 v1(23.2,36.5) R13.1@23.925,36.5 ; v1(24.75,37.7) 25.6,38.55 R18.1@25.6,38.8 ; R27.1@28.7,40.1 28.858,40.1 29.6,39.358 C246.1@29.6,39.1 29.6,38.5 v1(29.8,38.3)
  other v1: 32.8,48.1 32.8,49.7
+1V2_ETH: FB3.1 FB4.1 FB5.1 FB8.2 R352.2 R353.1 TP9.1 | length 2.2
  L10 w0.4: v1(11.5,60.9) 11.85,60.9 FB3.1@12.2,61.25 ; v1(20.6,63.7) FB8.2@21.2,63.7 ; FB5.1@22.2,67.3 22.8,67.3 v1(22.9,67.4)
  other v1: 18.6,73.4 20.8,81 21.6,81
+1V2_ETH_AVDDL: C186.1 C187.1 C188.1 C189.1 FB4.2 U7.4 U7.9 | length 1.3
  L1 w0.25: U7.9@14.35,70.54 v1(14.35,71.2) ; v1(16.8,71.2) 16.85,71.15 U7.4@16.85,70.54
+1V2_ETH_AVDDL_PLL: C191.1 C192.1 C193.1 FB5.2 U7.44 | length 0.7
  L1 w0.25: U7.44@19.04,67.85 v1(19.7,67.85)
+1V2_ETH_DVDDL: C180.1 C181.1 C182.1 C183.1 C184.1 C185.1 C248.1 C249.1 FB3.2 U7.14 U7.18 U7.23 U7.26 U7.30 U7.39 | length 6.5
  L1 w0.25: v1@11.5,64.65 11.7,64.85 U7.23@12.16,64.85 ; v1(11.5,67.3) 11.55,67.35 U7.18@12.16,67.35 ; v1(11.5,69.2) 11.65,69.35 U7.14@12.16,69.35 ; v1(13.35,63) U7.26@13.35,63.66 ; v1(15.35,63) U7.30@15.35,63.66 ; U7.39@19.04,65.35 19.55,65.35 v1(19.7,65.2)
  L10 w0.4: C181.1@10.9,69.6 11.1,69.6 v1(11.5,69.2) 11.9,68.8 C182.1@12.2,68.8 ; C249.1@19.1,65 19.5,65 v1(19.7,65.2)
  other v1: 11.3,63 11.4,64.6
+1V2_PMIC: C333.1 R353.2 TP33.1 U9.18 | length 3
  L1 w0.3: U9.18@23.65,27.95 24.35,27.95 v1(24.8,28.4)
  L10 w0.4: C333.1@23.5,27.8 23.5,28 23.9,28.4 v1(24.8,28.4)
  other v1: 22.9,81 22.9,81.8
+1V2_REG: C240.1 C241.1 R352.1 U32.7 U32.8 U32.10 U32.15
+1V2_VDD_ARM_CAP: C97.1 C98.1 C99.1 C100.1 C101.1 C102.1 C103.1 C104.1 C105.1 C106.1 U1.H11 U1.H13 U1.J11 U1.J13 U1.K11 U1.K13 U1.L11 U1.L13 U1.M11 U1.M13 U1.N11 U1.N13 U1.P11 U1.P13 U1.R11 U1.R13 | length 1.3
  L10 w0.3: C99.1@29.065,47.6 29.1,47.6 v1(29.6,48.1) ; v1(31.2,48.1) 31.6,47.7 C100.1@31.6,47.665
  other v1: 26.4,46.5 28,46.5 29.6,46.5 31.2,46.5 26.4,48.1 28,48.1
+1V5_DDR: C1.1 C2.1 C12.1 C13.1 C14.1 C15.1 C16.1 C17.1 C18.1 C19.1 C20.1 C21.1 C22.1 C23.1 C24.1 C25.1 C26.1 C27.1 C28.1 C29.1 C30.1 C31.1 C32.1 C33.1 C34.1 C35.1 C36.1 C37.1 C38.1 C39.1 C40.1 C41.1 C42.1 C43.1 C44.1 C45.1 C46.1 C47.1 C48.1 C49.1 C50.1 C51.1 C52.1 C53.1 C54.1 C55.1 C56.1 C57.1 C58.1 C59.1 C60.1 C74.1 C85.1 C86.1 C157.1 C158.1 C159.1 C160.1 C161.1 C162.1 C167.1 C168.1 C169.1 C170.1 C171.1 C172.1 C173.1 C203.1 C204.1 C205.1 C206.1 C322.2 C323.2 C340.1 C356.1 C357.1 C358.1 C359.1 C392.1 C437.1 FB10.2 FB20.1 L2.2 R245.2 R302.2 TP32.1 U1.R18 U1.T18 U1.U18 U1.V9 U1.V10 U1.V11 U1.V12 U1.V13 U1.V14 U1.V15 U1.V16 U1.V17 U1.V18 U2.A1 U2.A8 U2.B2 U2.C1 U2.C9 U2.D2 U2.D9 U2.E9 U2.F1 U2.G7 U2.H2 U2.H9 U2.K2 U2.K8 U2.N1 U2.N9 U2.R1 U2.R9 U3.A1 U3.A8 U3.B2 U3.C1 U3.C9 U3.D2 U3.D9 U3.E9 U3.F1 U3.G7 U3.H2 U3.H9 U3.K2 U3.K8 U3.N1 U3.N9 U3.R1 U3.R9 U4.A1 U4.A8 U4.B2 U4.C1 U4.C9 U4.D2 U4.D9 U4.E9 U4.F1 U4.G7 U4.H2 U4.H9 U4.K2 U4.K8 U4.N1 U4.N9 U4.R1 U4.R9 U5.A1 U5.A8 U5.B2 U5.C1 U5.C9 U5.D2 U5.D9 U5.E9 U5.F1 U5.G7 U5.H2 U5.H9 U5.K2 U5.K8 U5.N1 U5.N9 U5.R1 U5.R9 U9.30 U9.38 | length 95.2
  L1 w0.3: v1(24,19.45) 24.15,19.45 24.5,19.8 C437.1@24.5,20 C340.1@24.5,21.1 24.5,21.2 24.85,21.55 U9.30@24.85,22.25 ; U9.38@28.85,22.25 28.85,21.722 29.272,21.3 v1(29.4,21.3) ; C323.2@42.1,46.435 42.535,46.435 v1(42.6,46.5) ; v1(43.7,61.4) 43.7,61.135 C54.1@43.935,60.9 ; v1(43.8,25.4) 43.8,25.035 C1.1@43.935,24.9 ; v1(43.8,37.4) 43.8,37.035 C34.1@43.935,36.9 ; v1(43.9,49.6) 43.935,49.565 C44.1@43.935,48.9 ; C23.1@44.465,36.1 44.6,35.965 v1(44.6,35.6) ; C39.1@44.465,48.1 44.6,47.965 v1(44.6,47.6) ; C49.1@44.465,60.1 44.5,60.065 v1(44.5,59.6) ; C59.1@44.465,72.1 44.465,71.635 v1(44.5,71.6) ; v1(46.2,71.6) 46.265,71.665 C60.1@46.265,72.1 ; C2.1@46.265,24.9 46.265,25.165 46.5,25.4 v1(46.5,25.7) ; C24.1@46.265,36.1 46.265,35.635 v1(46.3,35.6) ; C40.1@46.265,48.1 46.265,47.635 v1(46.3,47.6) ; C45.1@46.265,48.9 46.265,49.565 v1(46.3,49.6) ; C50.1@46.265,60.1 46.4,59.965 v1(46.4,59.6) ; C55.1@46.295,60.9 46.4,61.005 v1(46.4,61.4) ; C35.1@46.4,37.035 C35.1@46.265,36.9 46.5,37.135 v1(46.5,37.4) ; C25.1@48.065,36.1 48.3,35.865 v1(48.3,35.6) ; C41.1@48.065,48.1 48.3,47.865 v1(48.3,47.6) ; C51.1@48.065,60.1 48.3,59.865 v1(48.3,59.6) ; C203.1@48.065,72.1 v1@48.565,71.6 ; v1(49.3,25.4) 49.368,25.333 49.435,25.265 49.565,25.135 49.565,24.907 49.935,24.537 C322.2@49.935,24.3 ; v1(50.9,22.55) C206.1@50.9,23.035 ; C36.1@51.665,36.9 51.7,36.935 v1(51.7,37.4) ; C46.1@51.665,48.9 51.665,49.365 v1(51.7,49.4) ; C56.1@51.665,60.9 51.7,60.935 v1(51.7,61.4) ; C21.1@53.165,24.9 53.4,25.135 v1(53.4,25.4) ; C37.1@53.465,36.9 53.6,37.035 v1(53.6,37.4) ; C47.1@53.465,48.9 53.6,49.035 v1(53.6,49.4) ; C57.1@53.465,60.9 53.6,61.035 v1(53.6,61.4) ; v1(54.6,35.6) 54.6,35.965 C26.1@54.735,36.1 ; v1(54.6,47.6) 54.6,47.965 C42.1@54.735,48.1 ; v1(54.6,59.6) 54.6,59.965 C52.1@54.735,60.1 ; v1(54.6,71.6) 54.6,71.965 C204.1@54.735,72.1 ; C22.1@54.965,25 54.965,25.365 v1(55,25.4) ; C48.1@55.265,48.9 55.5,49.135 v1(55.5,49.4) ; C58.1@55.265,60.9 55.5,61.135 v1(55.5,61.4) ; C38.1@55.4,37.035 C38.1@55.265,36.9 55.5,37.135 v1(55.5,37.4) ; C30.1@56.535,36.1 56.535,35.765 v1(56.8,35.5) ; C43.1@56.535,48.1 56.535,47.765 v1(56.8,47.5) ; C53.1@56.535,60.1 56.535,59.765 v1(56.8,59.5) ; C205.1@56.535,72.1 56.535,71.765 v1(56.8,71.5) ; C13.1@58.335,34 58.335,34.335 58.5,34.5 v1(58.7,34.5) ; C15.1@58.7,29.465 v1(58.7,30.1) ; C17.1@58.8,27.465 v1@59.165,27.465 ; C74.1@59.065,23.5 59.4,23.5 v1(59.9,23) ; v1(59.9,31) 59.965,31.065 C14.1@60.4,31.065 ; C18.1@61.1,24.465 62.015,24.465 v1(62.05,24.5) ; C16.1@61.5,27.265 61.615,27.265 v1(62.05,27.7)
  L1 w0.35: v1(44.1,44.5) U3.A8@44.5,44.9 ; U2.A1@44.5,27.3 v1(44.9,27.7) U2.B2@45.3,28.1 ; U2.A8@44.5,32.9 v1(44.9,33.3) ; U3.A1@44.5,39.3 v1(44.9,39.7) U3.B2@45.3,40.1 ; U4.A1@44.5,51.3 v1(44.9,51.7) U4.B2@45.3,52.1 ; U4.A8@44.5,56.9 v1(44.9,57.3) ; U5.A1@44.5,63.3 v1(44.9,63.7) U5.B2@45.3,64.1 ; U5.A8@44.5,68.9 v1(44.9,69.3) ; U2.C1@46.1,27.3 v1(46.5,27.7) U2.D2@46.9,28.1 ; U2.C9@46.1,33.7 v1(46.5,34.1) U2.D9@46.9,33.7 ; U3.C1@46.1,39.3 v1(46.5,39.7) U3.D2@46.9,40.1 ; U3.C9@46.1,45.7 v1(46.5,46.1) U3.D9@46.9,45.7 ; U4.C1@46.1,51.3 v1(46.5,51.7) U4.D2@46.9,52.1 ; U4.C9@46.1,57.7 v1(46.5,58.1) U4.D9@46.9,57.7 ; U5.C1@46.1,63.3 v1(46.5,63.7) U5.D2@46.9,64.1 ; U5.C9@46.1,69.7 v1(46.5,70.1) U5.D9@46.9,69.7 ; v1(47.3,34.1) U2.E9@47.7,33.7 ; v1(47.3,46.1) U3.E9@47.7,45.7 ; v1(47.3,58.1) U4.E9@47.7,57.7 ; v1(47.3,70.1) U5.E9@47.7,69.7 ; v1(48.1,26.9) U2.F1@48.5,27.3 ; v1(48.1,38.9) U3.F1@48.5,39.3 ; v1(48.1,50.9) U4.F1@48.5,51.3 ; v1(48.1,62.9) U5.F1@48.5,63.3 ; v1(48.9,32.5) U2.G7@49.3,32.1 ; v1(48.9,43.7) U3.G7@49.3,44.1 ; v1(48.9,56.5) U4.G7@49.3,56.1 ; v1(48.9,68.5) U5.G7@49.3,68.1 ; v1(49.7,27.7) U2.H2@50.1,28.1 ; v1(49.7,33.3) U2.H9@50.1,33.7 ; v1(49.7,39.7) U3.H2@50.1,40.1 ; v1(49.7,46.1) U3.H9@50.1,45.7 ; v1(49.7,51.7) U4.H2@50.1,52.1 ; v1(49.7,57.3) U4.H9@50.1,57.7 ; v1(49.7,63.7) U5.H2@50.1,64.1 ; v1(49.7,69.3) U5.H9@50.1,69.7 ; v1(51.3,28.5) U2.K2@51.7,28.1 ; v1(51.3,32.5) U2.K8@51.7,32.9 ; v1(51.3,40.5) U3.K2@51.7,40.1 ; v1(51.3,44.5) U3.K8@51.7,44.9 ; v1(51.3,52.5) U4.K2@51.7,52.1 ; v1(51.3,56.5) U4.K8@51.7,56.9 ; v1(51.3,64.5) U5.K2@51.7,64.1 ; v1(51.3,68.5) U5.K8@51.7,68.9 ; v1(54.1,26.8) U2.N1@54.1,27.3 ; U2.N9@54.1,33.7 v1(54.1,34.4) ; v1(54.1,38.8) U3.N1@54.1,39.3 ; U3.N9@54.1,45.7 v1(54.1,46.4) ; v1(54.1,50.8) U4.N1@54.1,51.3 ; U4.N9@54.1,57.7 v1(54.1,58.4) ; v1(54.1,62.8) U5.N1@54.1,63.3 ; U5.N9@54.1,69.7 v1(54.1,70.4) ; v1(55.3,34.1) U2.R9@55.7,33.7 ; v1(55.3,46.1) U3.R9@55.7,45.7 ; v1(55.3,58.1) U4.R9@55.7,57.7 ; v1(55.3,70.1) U5.R9@55.7,69.7 ; v1(55.7,26.8) U2.R1@55.7,27.3 ; v1(55.7,38.8) U3.R1@55.7,39.3 ; v1(55.7,50.8) U4.R1@55.7,51.3 ; v1(55.7,62.8) U5.R1@55.7,63.3
  L1 w0.5: v1(34.2,9.8) 34.575,9.425 42.825,9.425 45.175,11.775 47.375,11.775 48.8,13.2 FB20.1@49.75,13.2
  L10 w0.4: R302.2@1.4,42.5 1.9,42 v1(1.9,41.9) ; v1(58.5,45.7) 59,45.7 TP32.1@59.4,46.1
  other v1: 30.6,18.2 31.4,18.2 32.2,18.2 54.5,22.2 62.05,25.3 62.05,26.1 59.2,27.5 43.3,27.6 42.6,28 43.3,38.1 43.8,38.8 34.4,44.9 34.4,46.5 58.5,46.5 34.4,48.1 34.4,49.7 43.5,50.3 42.7,50.6 58.75,51 34.4,51.3 34.4,52.1 31.2,52.9 32.8,52.9 58.5,57.5 58.5,58.3 42.8,61.6 43.8,62.2 48.6,71.6
+1V5_MPCIE: C259.1 C260.1 C261.1 C262.1 FB10.1 J15.6 J15.28 J15.48
+1V8_AUDIO: C334.1 FB11.2 FB26.2 TP34.1 U9.26 | length 6.8
  L1 w0.3: U9.26@23.75,23.95 v1(24.5,23.95)
  L1 w0.4: FB26.2@52.65,16.1 52.5,15.95 v1(52.5,15.4) 52.5,14.15 52.75,13.9 FB11.2@52.75,13.2
  L10 w0.4: v1(24.5,23.95) 25.1,24.55 C334.1@25.1,24.6 ; v1(52.5,15.4) 52.5,14.3 53.1,13.7 TP34.1@53.2,13.7
+1V375_CORE: C90.1 C91.1 C92.1 C93.1 C94.1 C95.1 C96.1 C107.1 C108.1 C109.1 C110.1 C111.1 C352.1 C353.1 C354.1 C355.1 FB8.1 L1.2 R340.2 TP8.1 U1.H14 U1.J14 U1.K9 U1.K14 U1.L9 U1.L14 U1.M9 U1.M14 U1.N9 U1.N14 U1.P9 U1.P14 U1.R9 U1.R14 U1.T9 U1.U9 U9.6 | length 3.8
  L1 w0.3: v1(28.15,30.9) 28.35,30.7 U9.6@28.35,30.15
  L10 w0.3: v1(31.2,49.7) 31.535,50.035 C95.1@31.7,50.035
  L10 w0.4: FB8.1@22.2,63.7 v1(22.8,63.7) ; v1(26,31.9) 26.3,32.2 R340.2@26.8,32.2 ; TP8.1@30,34.9 30.4,34.5 v1(30.4,34.3)
  other v1: 29.6,34.3 31.2,34.3 32,34.3 28,44.9 29.6,44.9 31.2,44.9 32.8,44.9 26.4,49.7 28,49.7 29.6,49.7
+1V375_SOC: C119.1 C120.1 C121.1 C122.1 C123.1 C124.1 C125.1 C126.1 C127.1 C128.1 C129.1 C360.1 C361.1 C408.1 C409.1 C410.2 C424.1 L8.1 L12.2 R336.2 R384.1 TP11.1 U1.H16 U1.J16 U1.K16 U1.L16 U1.M16 U1.N16 U1.P16 U1.R16 U1.T16 U1.U16 | length 3
  L1 w0.4: R336.2@15.1,34.3 15.1,34.4 v1(15.6,34.9) C410.2@15.1,35.4
  L10 w0.4: v1(15.6,34.9) 16,35.3 TP11.1@16,35.4 ; C129.1@25.6,56.05 25.65,56.1 v1(26.4,56.1)
  other v1: 23,32.5 23,33.3 23,34.1 23,34.9 26.4,51.3 28,51.3 29.6,51.3 31.2,51.3 32.8,51.3
+2V5: C153.1 C209.1 C244.1 C247.1 C336.1 FB6.1 R14.1 R19.1 R29.1 R36.1 R74.2 R78.2 R80.2 TP35.1 U9.28 | length 14.5
  L1 w0.3: v1(23.6,22.4) 23.65,22.45 U9.28@23.65,22.95
  L10 w0.4: FB6.1@13.4,59.65 13.75,59.3 v1(14.15,59.3) ; v1(16.8,57.7) 17.175,57.325 17.175,57.283 17.958,56.5 R80.2@18.1,56.5 ; v1(17.8,40.8) 17.825,40.775 19.875,40.775 R14.1@19.9,40.8 ; v1(17.9,53.9) 17.9,52.8 C209.1@18.4,52.3 R19.1@19.5,52.3 ; v1(23.6,22.4) 23.7,22.3 C336.1@24.1,22.3 ; R78.2@27.2,39.1 27.2,38.4 C244.1@27.6,38 27.575,37.975 27.575,36.925 v1(28.1,36.4) ; v1(29.8,37.5) 29.9,37.4 C247.1@30.5,37.4 30.5,37.9 30.7,38.1 R29.1@30.7,38.5 ; R74.2@33.9,58.5 34,58.5 v1(34.4,58.9)
  other v1: 37.6,39.3
+2V5_ETH_DVDDH: C194.1 C195.1 C196.1 C197.1 C198.1 FB6.2 R75.2 R87.2 R89.2 R91.2 R94.2 R95.2 R96.2 R97.2 R98.2 R162.2 U7.16 U7.34 U7.40 | length 13
  L1 w0.25: v1(11.5,68.4) 11.55,68.35 U7.16@12.16,68.35 ; v1(17.35,63) U7.34@17.35,63.66 ; U7.40@19.04,65.85 19.55,65.85 v1(19.7,66)
  L1 w0.4: v1(9.5,70.2) 10.1,70.8 R94.2@10.2,70.8 ; R96.2@16.4,59.8 16.4,60.25 v1(16.6,60.45) 16.4,60.65 R98.2@16.4,61.1 ; v1(17.1,56.6) 17.6,56.6 R91.2@17.7,56.5 ; v1(17.7,57.5) R97.2@17.7,58.2 ; v1(18.6,60.4) 18.7,60.3 R95.2@19.2,60.3 ; R87.2@22.2,63 22.3,63 v1(22.8,62.5) R162.2@23.6,63.3 ; v1(22.9,66.6) 23.3,66.2 R75.2@23.5,66.2
  L10 w0.4: C195.1@10.9,68.4 v1(11.5,68.4) 12.1,67.8 C198.1@12.2,67.8 ; C197.1@17.1,63.6 17.1,63.25 v1(17.35,63) ; C196.1@19.1,66.1 19.6,66.1 v1(19.7,66) ; R89.2@22.2,66.1 22.4,66.1 v1(22.9,66.6)
  other v1: 14.15,61.4
+2V5_VDDHIGH_VPH: C139.1 C140.1 C141.1 U1.H10 U1.J10 | length 3.3
  L1 w0.4: U1.H10@26,46.1 v1(26.4,45.7) U1.J10@26.8,46.1
  L10 w0.3: C139.1@25.9,46.235 25.9,46.2 v1(26.4,45.7) 26.7,45.4 C140.1@26.935,45.4
  L10 w0.4: C141.1@24,40.15 v1(24,40.9)
+3V0_ALWAYS: C87.1 C136.1 C137.1 C142.1 C338.1 C412.1 R48.2 R55.2 R59.2 R73.2 R171.2 R172.2 R173.2 R225.2 R229.2 R264.2 R266.2 R272.2 R405.2 TP37.1 U1.G11 U1.H9 U1.J9 U9.41 U10.5 U31.6 | length 21
  L1 w0.3: U9.41@30.35,22.25 30.35,21.5 v1(30.55,21.3)
  L1 w0.4: v1(24.8,47.3) U1.G11@25.2,46.9 ; U1.H9@26,45.3 v1(26.4,44.9) U1.J9@26.8,45.3
  L10 w0.3: R55.2@24.265,47.1 24.6,47.1 v1(24.8,47.3) 24.8,47.265 C142.1@25.3,46.765 ; C136.1@25.9,44.365 26.4,44.865 v1(26.4,44.9)
  L10 w0.4: U10.5@2.55,39.15 3.4,38.3 C87.1@3.6,38.3 4.25,38.3 v1(4.45,38.1) ; U31.6@4.55,43.25 4.7,43.1 C412.1@5.7,43.1 5.7,43.6 v1(5.6,43.7) ; v1(6.4,36.7) R229.2@6.4,37.3 ; v1(6.7,26.6) 6.8,26.5 R73.2@6.8,26 R73.2@6.8,25.9 ; R405.2@7.7,39.4 8.2,39.4 v1(8.3,39.5) ; R48.2@13.3,46.1 13.9,46.7 v1(14.7,46.7) 14.7,46 R172.2@14.5,45.8 ; R225.2@15.3,40.6 15.5,40.6 v1(15.9,40.2) ; R173.2@16,50.1 16.3,50.1 v1(16.5,50.3) 16.5,50.7 17.1,51.3 R171.2@17.2,51.3 ; v1(20.8,47.3) 20.8,48.05 20.75,48.1 C137.1@20.8,48.1 ; v1(27.4,35.9) 27.6,35.7 R266.2@27.6,35.2 ; C338.1@30.1,20.7 30.1,20.85 v1(30.55,21.3) ; R264.2@32.8,33.6 v1@33.6,33.6 ; TP37.1@33.3,34.8 33.3,33.9 v1@33.6,33.6 ; v1(33.7,33.5) v1@33.6,33.6
  other v1: 2.1,34.2
+3V0_VSNVS: C343.1 R262.2 R347.2 R385.2 U9.43 | length 3.8
  L1 w0.3: U9.43@31.55,22.95 32,22.95 v1(32.3,22.65)
  L10 w0.4: R347.2@1.4,27.1 v1(2,27.1) ; v1(5.1,22.1) 5.3,22.1 R262.2@5.6,22.4 ; R385.2@29.5,14.7 29.7,14.5 v1(29.7,13.9) ; C343.1@32.1,21.9 32.3,22.1 v1(32.3,22.65)
+3V3: C89.1 C144.1 C146.1 C147.1 C148.1 C154.1 C163.1 C164.1 C165.1 C166.1 C174.1 C273.1 C280.1 C296.1 C307.1 C310.1 C324.2 C326.2 C329.1 C330.1 C332.1 C364.1 C365.1 C380.1 C384.1 C386.1 C395.1 C396.1 C405.1 C414.1 C417.1 C418.1 C426.1 D1.2 D2.2 D3.2 D5.2 D6.2 D7.2 D11.2 D13.2 D14.2 D21.2 D22.2 D25.2 D26.2 D30.2 D33.2 D34.2 FB7.1 FB9.1 FB12.1 FB13.2 FB14.1 FB16.1 FB19.1 FB30.1 FB33.1 FB36.1 FB41.2 FB42.2 FB43.1 J6.14 J6.16 J13.4 L10.2 Q8.2 Q8.5 Q11.2 Q11.5 R15.2 R21.2 R28.2 R46.2 R49.2 R57.2 R62.2 R63.2 R64.2 R68.2 R69.2 R76.2 R109.1 R114.2 R116.2 R118.2 R132.2 R133.2 R134.2 R137.2 R140.2 R142.2 R143.2 R147.2 R148.2 R150.2 R151.2 R159.2 R197.2 R198.2 R201.2 R208.2 R209.2 R212.2 R213.2 R226.2 R240.2 R244.2 R251.2 R252.2 R257.2 R258.1 R260.2 R263.2 R280.2 R289.2 R290.2 R291.2 R319.2 R355.1 R356.2 R359.2 R360.2 R370.2 R371.2 R375.2 R376.2 R381.2 R410.2 TP15.1 U1.G14 U1.G15 U1.G16 U1.G17 U1.J7 U1.K19 U1.L19 U1.M19 U1.P7 U1.P19 U8.5 U9.17 U9.25 U9.27 U9.55 U11.5 U15.8 U18.1 U18.2 U18.3 U18.8 U20.5 U24.4 U25.5 U26.5 U29.5 U33.5 U34.1 U34.16 | length 126
  L1 w0.28: U34.16@26.95,71.45 26.95,70.35 C418.1@27,70.3 ; C417.1@28.2,70.3 28.2,70.6 28.45,70.85 U34.1@28.45,71.45
  L1 w0.3: v1@22.9,23.55 23,23.45 U9.27@23.65,23.45 ; v1(22.9,24.3) 23.05,24.45 U9.25@23.65,24.45 ; v1(22.9,28.45) U9.17@23.65,28.45 ; v1(30.8,28.8) 30.95,28.95 U9.55@31.55,28.95
  L1 w0.4: D34.2@1.3,68.8 1.3,69.7 v1(1,70) 1.3,70.3 D7.2@1.3,71 ; D6.2@1.3,73.2 1.3,74 v1(1,74.3) 1.3,74.6 D5.2@1.3,75.4 ; D33.2@1.3,77.6 1.3,78.4 v1(1,78.7) 1.3,79 D3.2@1.3,79.8 ; D2.2@1.3,82 1.2,82.1 v1(1.2,83.1) 1.2,84.1 D1.2@1.3,84.2 ; v1(2.4,10) 3,9.4 D22.2@3,8.3 ; v1(2.5,68) 2.9,67.6 C307.1@2.9,67.5 ; D22.2@3.1,8.2 D22.2@3.1,8.3 ; U20.5@11.65,49.55 11.65,50.55 C310.1@11.8,50.7 11.8,50.75 v1(12.3,51.25) ; R252.2@11.9,54.5 12.5,53.9 v1(12.8,53.9) R251.2@12.8,53.5 ; v1(12.2,36.65) 12.7,37.15 C386.1@12.7,37.2 12.7,37.5 12.95,37.75 U11.5@12.95,38.35 ; v1(12.3,22.2) 12.4,22.1 R289.2@12.4,21.6 ; U25.5@13.45,23.5 13.966,23.5 14.4,23.934 v1(14.4,24.1) ; v1(14.8,57.7) 15.3,57.2 R212.2@15.3,56.9 ; v1(15.4,36.3) R49.2@15.4,36.9 ; U1.G14@25.2,49.3 v1(24.8,49.7) U1.G15@25.2,50.1 ; U1.G16@25.2,50.9 v1(24.8,51.3) U1.G17@25.2,51.7 ; v1(25.6,71.1) 25.6,70.5 R319.2@25.8,70.3 ; U24.4@25.85,87.65 25.85,87.192 26.3,86.742 C396.1@26.3,86.4 C326.2@26.3,85.4 26.3,85 v1(26.5,84.8) ; v1(26.4,43.3) U1.J7@26.8,43.7 ; v1(26.7,93.3) 26.8,93.2 R257.2@27.4,93.2 ; C418.1@27,70.3 v1(27.6,70.3) C417.1@28.2,70.3 ; v1(28.8,69.3) C384.1@29.4,69.3 30.55,68.15 U15.8@30.595,68.15 ; v1(29.1,82.3) 29.2,82.2 R46.2@29.2,81.6 ; v1(30.4,53.7) U1.P19@30.8,53.3 ; R360.2@30.5,69.3 30.7,69.3 v1(31.2,69.8) 31.7,70.3 R109.1@31.8,70.3 ; R359.2@30.7,71.3 30.8,71.3 v1(31.2,70.9) ; U1.P7@30.8,43.7 v1(31.2,43.3) ; D21.2@31.6,1.1 31.7,1.2 v1(32.5,1.2) ; R244.2@32.3,60.8 v1(32.3,61.7) ; v1(32.8,37.8) 33.3,37.3 R151.2@33.3,37 ; D11.2@33,11.3 33,10.8 v1(33.3,10.5) ; R197.2@35.6,34.5 35.8,34.5 v1(36.1,34.8) ; R410.2@38.5,35.3 38.8,35.3 v1(39.2,35.7) ; J13.4@39.515,5.575 39.515,6.823 40.6,7.908 v1(40.6,7.95) ; v1(40.3,73.5) 40.8,73 D13.2@40.8,72.881 ; FB13.2@49.65,16.1 FB13.2@49.65,16.25 ; FB13.2@49.8,16.25 v1(49.8,16.8) ; FB12.1@50.2,9.85 50.75,9.85 51.4,9.2 C280.1@51.65,9.2 ; D14.2@51,1.1 51.6,1.1 v1(51.8,1.3) ; C280.1@51.85,9.2 C280.1@51.65,9.2 ; v1(52.4,8.4) 52.4,8.45 C280.1@51.65,9.2 ; v1(59.2,67.2) 59.85,66.55 FB19.1@60.4,66.55 ; R114.2@62.6,37.6 v1(63.215,37.6) ; U26.5@65.65,10.6 66.3,10.6 66.6,10.3 66.6,9.1 C329.1@66,8.5 ; C329.1@65.8,8.4 65.9,8.4 v1(66.3,8)
  L10 w0.3: v1(26.4,43.3) 26.9,43.8 C174.1@26.9,43.835 ; R260.2@31.735,42.8 31.7,42.8 v1(31.2,43.3) 31.235,43.3 C163.1@31.735,43.8 ; U29.5@62.85,25.85 63.15,25.85 63.325,25.675 63.325,24.325 C405.1@62.9,23.9
  L10 w0.38: U18.8@60.525,35.4 60.525,34.925 60.3,34.7 C324.2@60.3,34 60.8,34 v1(60.9,34.1) ; U18.1@60.525,39.2 60.525,39.925 60.8,40.2 61.45,40.2 ; TP15.1@60.7,41.1 v1@61.6,40.2 ; U18.2@61.175,39.2 61.175,39.925 61.45,40.2 ; U18.3@61.825,39.2 v1(61.825,40.2) v1@61.6,40.2 ; 61.45,40.2 v1@61.6,40.2
  L10 w0.4: v1(2.1,28.3) 2.3,28.1 R140.2@2.7,28.1 ; R148.2@5.2,34.3 5,34.5 v1(5,34.9) 5,35.1 R209.2@5.4,35.5 ; v1(5.7,55.9) 5.7,56.3 6,56.6 R290.2@6.4,56.6 ; R208.2@6.7,40.6 6.7,40.8 v1(7.1,41.2) ; v1(7.1,51.4) FB43.1@7.7,51.4 ; R142.2@7.3,88 7.3,88.4 7.7,88.8 7.9,88.8 R137.2@8.4,88.3 ; v1(7.4,54.3) 7.6,54.1 R291.2@7.6,53.7 ; v1(7.8,88.9) R137.2@8.4,88.3 ; R137.2@8.4,88.2 R137.2@8.4,88.3 ; U8.5@11.65,38.35 11.65,37.25 C89.1@11.7,37.2 11.7,37.15 v1(12.2,36.65) ; R68.2@11.7,42.4 12.15,42.4 v1(12.3,42.25) 12.45,42.4 R69.2@12.9,42.4 ; v1@12.3,51.2 12.3,51 R280.2@12.8,50.5 ; C395.1@13.8,24 14.3,24 v1(14.4,24.1) ; FB42.2@14.7,56.9 FB42.2@14.75,56.9 ; v1(14.8,57.7) 15.5,58.4 R147.2@15.6,58.4 ; v1(15.4,36.3) 15.6,36.5 R62.2@16,36.5 ; v1(16.2,54.6) R143.2@17.7,54.6 ; R64.2@17.5,39.2 17.6,39.1 R63.2@18.6,39.1 19.1,39.1 v1(19.3,38.9) ; R381.2@20.7,61.6 20.7,62.1 v1(20.9,62.3) ; v1(22.4,16.7) 22.6,16.7 FB30.1@22.9,16.4 ; v1(22.8,6.2) 23.3,6.2 R198.2@24.1,5.4 ; v1(22.9,23.5) 23.075,23.325 23.7,23.325 C332.1@23.7,23.3 ; v1(22.9,28.45) 23,28.55 C330.1@23,29 ; J6.16@23.718,90.007 24.611,90.9 C273.1@25.4,90.9 ; FB7.1@25.55,71.9 25.6,71.85 v1(25.6,71.1) ; v1(26.2,11.8) 26.5,11.5 R213.2@26.5,11.3 R213.2@26.5,11.2 ; v1(26.7,93.3) 27,93.3 R258.1@27.5,92.8 ; R133.2@27.5,88 v1(27.5,88.7) R134.2@27.5,89.2 ; R240.2@28.3,60.7 28.7,60.7 v1(29.1,61.1) ; v1(30.8,28.8) C380.1@30.8,29.4 ; R57.2@31.8,59.8 31.8,58.7 v1(32,58.5) 32.2,58.7 R159.2@32.7,58.7 ; R76.2@32.1,38.5 v1(32.8,37.8) ; v1(32.3,61.7) 32.4,61.7 32.8,61.3 R15.2@32.8,61 ; R263.2@32.9,32.5 33.1,32.7 v1(33.7,32.7) ; v1(33.3,10.5) 33.8,11 R201.2@33.8,11.1 ; R116.2@34.3,36.6 34.3,37.6 v1(34.4,37.7) ; v1(37.6,33.4) 37.8,33.2 R132.2@38.2,33.2 ; U33.5@38.25,79.95 38.25,80.95 C414.1@38.1,81.1 38.6,81.1 v1(38.8,80.9) ; R21.2@39.6,73.8 40,73.8 v1(40.3,73.5) ; R118.2@39.6,75.1 39.6,75.2 v1(40.1,75.7) 40.1,75.9 R356.2@39.6,76.4 ; v1(40.6,7.95) 41,8.35 C296.1@41,8.4 ; v1(49.55,92.6) R370.2@50.3,92.6 ; Q8.2@51.75,91.7 v1(52.5,91.7) ; v1(53.5,93.05) 53.7,93.25 R375.2@53.7,93.7 ; Q8.5@53.65,91.7 v1(54.4,91.7) ; v1(54.3,90.5) 54.9,89.9 R376.2@54.9,89.8 ; Q11.2@56.65,91.7 v1(57.4,91.7) ; Q11.5@58.55,91.7 v1(59.3,91.7) ; v1(58.6,93.05) 58.8,93.25 R371.2@58.8,93.7 ; FB33.1@62.4,20.65 62.425,20.675 62.425,21.225 v1@63,21.8 ; C405.1@62.9,23.9 62.9,23.4 v1(63,23.3) ; R226.2@66.7,11.4 v1(67.2,11.9)
  other v1: 31.2,6.7 33.7,9.2 53.9,13.7 54.8,13.7 63,21.9 19.3,24.7 19.9,25.3 18.9,25.4 37.1,29.7 61.2,43.2 62.3,43.2 28,53.7 29.6,53.7 7.6,57.1 13.9,57.7 8.3,57.9 10,80.6 11.4,80.6 53.8,87.6 53.8,88.4
+3V3_COMP: C387.1 C388.1 FB33.2 R243.1 U22.14 | length 5.4
  L1 w0.3: C388.1@59.4,14.6 59.5,14.6 60,15.1 60.5,15.1 60.7,15.3 U22.14@60.7,15.625 ; C388.1@59.45,14.55 59.4,14.5 59.4,14.1 v1(59.6,13.9)
  L1 w0.4: R243.1@64.5,13.3 65,13.3 v1(65.1,13.4)
  L10 w0.4: FB33.2@62.4,19.15 63.25,19.15 v1(64.1,18.3)
+3V3_COMP_IO: C389.1 R110.1 R243.2 R315.2 U22.1 | length 4.6
  L1 w0.3: U22.1@62.275,15.9 62.475,15.7 62.475,14.525 C389.1@62.5,14.5
  L1 w0.4: R110.1@61.2,21.7 61.6,21.7 v1(61.9,21.4) 62,21.3 R315.2@62.5,21.3 ; C389.1@62.5,14.5 62.6,14.5 v1(63.1,14) 63.5,13.6 R243.2@63.5,13.3
+3V3_CSI1: C225.1 C226.1 FB16.2 J7.1 J7.2
+3V3_ETH_AVDDH: C190.1 C199.1 C200.1 C201.1 C202.1 FB7.2 U7.1 U7.12 U7.47 | length 5.7
  L1 w0.25: U7.12@12.85,70.54 v1(12.85,71.2) ; U7.1@18.35,70.54 v1(18.35,71.2) ; U7.47@19.04,69.35 19.6,69.35 v1(19.7,69.25)
  L10 w0.4: C190.1@12.3,71 12.65,71 v1(12.85,71.2) 13.05,71 C200.1@13.4,71 ; C202.1@17.7,70.5 17.7,70.55 v1(18.35,71.2) ; C201.1@19.1,68.3 19.1,68.6 19.7,69.2 v1(19.7,69.25) ; FB7.2@23.95,72 FB7.2@24.05,71.9 FB7.2@24.05,71.75
  other v1: 20.1,71.1
+3V3_GYRO: C400.1 C401.1 FB36.2 R320.1 U28.15 | length 0.8
  L1 w0.3: v1(40.2,29.4) U28.15@40.2,30.225
+3V3_GYRO_IO: C402.1 R312.1 R317.1 R320.2 R383.1 U28.18 | length 5.8
  L1 w0.3: U28.18@41.7,30.225 v1(41.7,31.05)
  L1 w0.4: v1(42,35.8) 42.5,36.3 R312.1@42.7,36.3 ; R317.1@42.7,28.7 43,28.7 v1(43.4,29.1)
  L10 w0.4: R320.2@41.2,28.8 41.6,29.2 C402.1@41.6,30.4 41.6,30.95 v1(41.7,31.05) ; R383.1@41.3,33.1 41.3,32.6 v1(41.5,32.4)
+3V3_HDMI: C214.1 R46.1 U12.2 | length 5.9
  L1 w0.28: C214.1@29.2,79.5 C214.1@29.3,79.5 ; U12.2@31,76.05 31,77.4
  L1 w0.4: R46.1@29.2,80.6 29.3,80.5 C214.1@29.3,79.6 30.1,79.6 31,78.7 31,77.4
+3V3_HDR: C429.1 C430.1 C431.1 C432.2 D38.2 FB39.2 FB40.2 L13.2 R399.2 TP40.1 | length 2
  L10 w0.4: C432.2@14,93.8 R399.2@15.1,93.8 15.4,93.8 v1(15.8,93.4)
  other v1: 62.3,46.7 62.3,47.5 11.2,56.1 12,56.1 18.2,88.5 19.2,88.5 20.2,88.5 21.2,88.5 60.7,89.1 61.5,89.1
+3V3_HDR_J1: C298.2 C419.1 FB40.1 FB42.1 J1.7
+3V3_HDR_J2: C299.1 C300.1 C301.1 FB39.1 FB41.1 J2.1 J2.17 | length 2.5
  L10 w0.4: J2.1@65.5,64.1 65.5,65.2 66,65.7 C301.1@66,66.4
  other v1: 63.9,44.8 63.9,45.6
+3V3_IR: C325.1 C394.1 R226.1 U23.3 | length 4.1
  L10 w0.4: R226.1@65.7,11.4 C394.1@65.7,12.5 C325.1@66.7,12.5 67.76,12.5 U23.3@68.4,13.14
+3V3_LDO: C337.1 FB29.1 TP36.1 U9.39 | length 10.2
  L1 w0.3: v1(29.1,23) 29.35,22.75 U9.39@29.35,22.25
  L10 w0.4: FB29.1@25.9,16.4 27.1,16.4 28.1,17.4 28.1,20.2 27.5,20.8 27.5,21.7 C337.1@28.1,22.3 28.4,22.3 v1(29.1,23)
+3V3_MCU: C219.1 C220.1 C221.1 C222.1 C385.1 D24.2 FB29.2 FB30.2 Q14.2 R270.2 R380.2 R386.2 U6.6 U6.29 U21.5 | length 15.5
  L1 w0.4: C221.1@15.9,24 C222.1@16.9,24 16.9,24.25 17.75,25.1 v1(17.75,25.35) ; v1(18,1.9) 18,1.6 D24.2@18.5,1.1 ; U21.5@19.844,21.25 U21.5@19.85,21.25 20.956,21.25 22.206,22.5 22.6,22.5 v1(22.9,22.8) ; R270.2@20.2,18.8 20.2,18.1 21.1,17.2 v1(21.4,17.2)
  L10 w0.3: v1(17.75,25.35) 17.978,25.35 18.925,24.403 U6.29@18.925,23.85 ; U6.6@21.95,19.525 22.457,19.525 22.757,19.225 v1(22.8,19.225)
  L10 w0.4: R380.2@7.7,23.3 v1(7.7,24) ; Q14.2@12.9,17.15 12.95,17.2 v1(14.3,17.2) ; v1(14.8,15) R386.2@15.4,15
  other v1: 23.6,17
+3V3_MPCIE: C257.1 C258.1 C263.1 C264.1 C265.1 C266.1 C267.1 C268.1 FB9.2 J15.2 J15.24 J15.39 J15.41 J15.52 | length 10.6
  L10 w0.4: J15.52@35.2,23.6 35.2,24.592 36.308,25.7 ; C265.1@36.4,25.7 v1(37.4,25.7) ; C266.1@39.6,13.375 v1(39.6,14) J15.41@39.6,15.4 ; J15.39@40.4,15.4 v1(40.4,14) 40.6,13.8 C263.1@40.6,13.375 ; v1@46.4,22.3 J15.24@46.4,23.6 ; J15.2@58.4,23.6 58.4,22.8 v1(59,22.2)
  other v1: 46.4,22.2
+3V3_USB_HUB: C243.1 C245.2 C250.1 C251.2 C255.1 C256.1 C269.1 C270.1 C271.2 FB19.2 R169.2 R217.2 R283.1 R284.1 R285.2 R286.2 U13.5 U13.10 U13.15 U13.23 U13.29 U13.36 | length 18.1
  L1 w0.25: U13.29@64.7,75.9 v1(64.7,77.1)
  L1 w0.28: v1(58,73.3) 58.2,73.1 U13.5@60.4,73.1 ; v1(61.2,69.5) U13.10@61.2,70.3 ; U13.36@61.2,75.9 v1(61.2,76.7) ; v1(63.7,69.4) U13.15@63.7,70.3 ; U13.23@66,73.1 v1(66.8,73.1)
  L1 w0.4: FB19.2@60.4,68.05 61.25,68.05 v1(61.5,68.3) ; R169.2@64.8,81.3 64.4,81.3 v1(64.1,81.6) 64.8,82.3 R217.2@64.8,82.4 ; R283.1@67.2,69.3 v1(67.2,70) 67.3,70.1 R284.1@67.3,70.6
  L10 w0.4: v1(58,73.3) 58.025,73.325 58.025,73.725 58.2,73.9 C255.1@58.2,74.6 ; v1(61.5,68.3) 62.1,67.7 R285.2@62.2,67.7 ; v1(64.7,77.1) 64.7,77.3 C269.1@65.2,77.8 ; R286.2@66.8,69.4 66.8,69.6 v1(67.2,70) ; v1(66.8,73.1) 66.8,73.044 67.5,72.344 C251.2@67.5,72 67.475,71.975 67.475,70.825 C250.1@67.5,70.8
  other v1: 59.8,77.55
+5V: C73.1 C75.1 C213.1 C237.1 C366.1 C404.1 C434.1 D18.1 FB17.1 FB32.2 FB35.2 FB38.1 FB44.1 R215.1 TP16.1 U1.D10 U1.E9 U9.44 U12.1 | length 9.1
  L1 w0.3: U9.44@31.55,23.45 32.6,23.45 v1(32.8,23.25)
  L1 w0.4: U1.D10@22.8,46.1 v1(23.2,45.7) U1.E9@23.6,45.3 ; v1(28.4,76.4) C213.1@29.3,76.4 U12.1@30.4,76.4 ; v1(65.5,82.3) 65.6,82.4 C237.1@66,82.4 ; R215.1@66,81.3 66.1,81.4 66.1,82.3 C237.1@66,82.4 ; C237.1@66.1,82.4 C237.1@66,82.4
  L10 w0.3: C73.1@23.735,45.4 23.5,45.4 v1(23.2,45.7) 23.5,46 C75.1@23.735,46
  L10 w0.4: FB44.1@7.7,49.4 8,49.4 8.4,49.8 v1(8.4,50.4)
  other v1: 33,18 33.05,18.85 35.8,29.6 35.8,30.4 64.3,66.9 7.9,67.4 64.3,67.7 7.3,67.9 38.7,79.1 41.7,80.6 40,82.4
+5V_FTDI: C421.1 C422.1 D30.1 D38.1 J3.3 R372.2 R377.2 | length 11.6
  L3 w0.5: v1(55.1,90.5) 59.6,86 v1(60,86) 60,88.7 v1(59.6,89.1)
  L10 w0.4: v1(55.1,90.5) R372.2@55.1,91.1 ; v1(59.6,89.1) 60.2,89.7 R377.2@60.2,89.8
+5V_HDMI_CON: C216.1 J5.18 R187.2 R188.2 U12.38 | length 5.1
  L1 w0.28: v1(30.5,81) U12.38@30.5,82.05
  L1 w0.3: J5.18@40.5,85.44 40.5,86.8 v1(40.8,87.1)
  L10 w0.4: R188.2@36.1,86.4 36.1,87 v1(36.2,87.1) ; R187.2@40.8,86.2 v1(40.8,87.1) 40.9,87.2 C216.1@40.9,87.7
+5V_HDR_J1: C238.1 C420.1 D23.1 FB34.1 FB35.1 J1.1 | length 1.2
  L1 w0.4: v1(9.5,65.7) 10.1,66.3 D23.1@10.1,66.7
+5V_HDR_J2: C302.1 C303.1 C304.1 FB31.1 FB32.1 J2.2 J2.4 | length 0.8
  L10 w0.4: C303.1@63.3,65.5 63.3,65 v1(63.5,64.8)
  other v1: 66.9,66.8 67.7,66.8
+5V_MPCIE: C227.1 C228.1 FB17.2 FB37.2 J15.49 J15.51
  other v1: 36.4,14 34.7,14.4
+5V_USB_BOT: C233.1 C235.1 D17.1 FB23.2 FB38.2 J4.1 U17.8 | length 1.4
  L10 w0.4: C235.1@53.2,87.6 v1(53.2,87) 53.2,86.3 D17.1@53.3,86.2
  other v1: 42.4,82.2 42.4,83 48.5,88.7 48.5,89.5
+5V_USB_OTG: C231.1 C232.1 D16.1 FB2.2 J11.1 Q2.3 TP4.1 | length 2.1
  L1 w0.35: C231.1@23.45,6.9 23.6,6.75 J11.1@23.6,4.875
  other v1: 22.6,7 23.3,7.8
+5V_USB_OTG_Q: C230.2 Q1.2 Q2.2 R214.2 U16.5 | length 2.7
  L10 w0.4: R214.2@8,4.1 v1(8.6,4.1) ; v1(10.2,4.2) 10.5,3.9 C230.2@10.5,3.3 10.5,2.4 U16.5@10.65,2.25
+5V_USB_TOP: C234.1 C236.1 D20.1 FB24.1 J4.5 U17.5 | length 2.1
  L10 w0.4: D20.1@55.3,75.8 56.3,75.8 v1(56.5,76) 56.7,75.8 C236.1@57.2,75.8
  other v1: 46.105,82.195 46.105,82.995 48.5,87.1 48.5,87.9